# Altium PCB Urukul.PcbDoc (part 13 of 15)
Units mm, origin at the board's own origin, x right, y up, seen from the top; angles counter-clockwise.
Board outline 161.99 x 100 mm, 6 copper layers (L1, L2, L3, L4, P5, L6), stack 1.548 mm thick; 1078 components, 609 nets, 3798 pads, 2552 vias.
Unrouted connection lines stored in the file: 1.
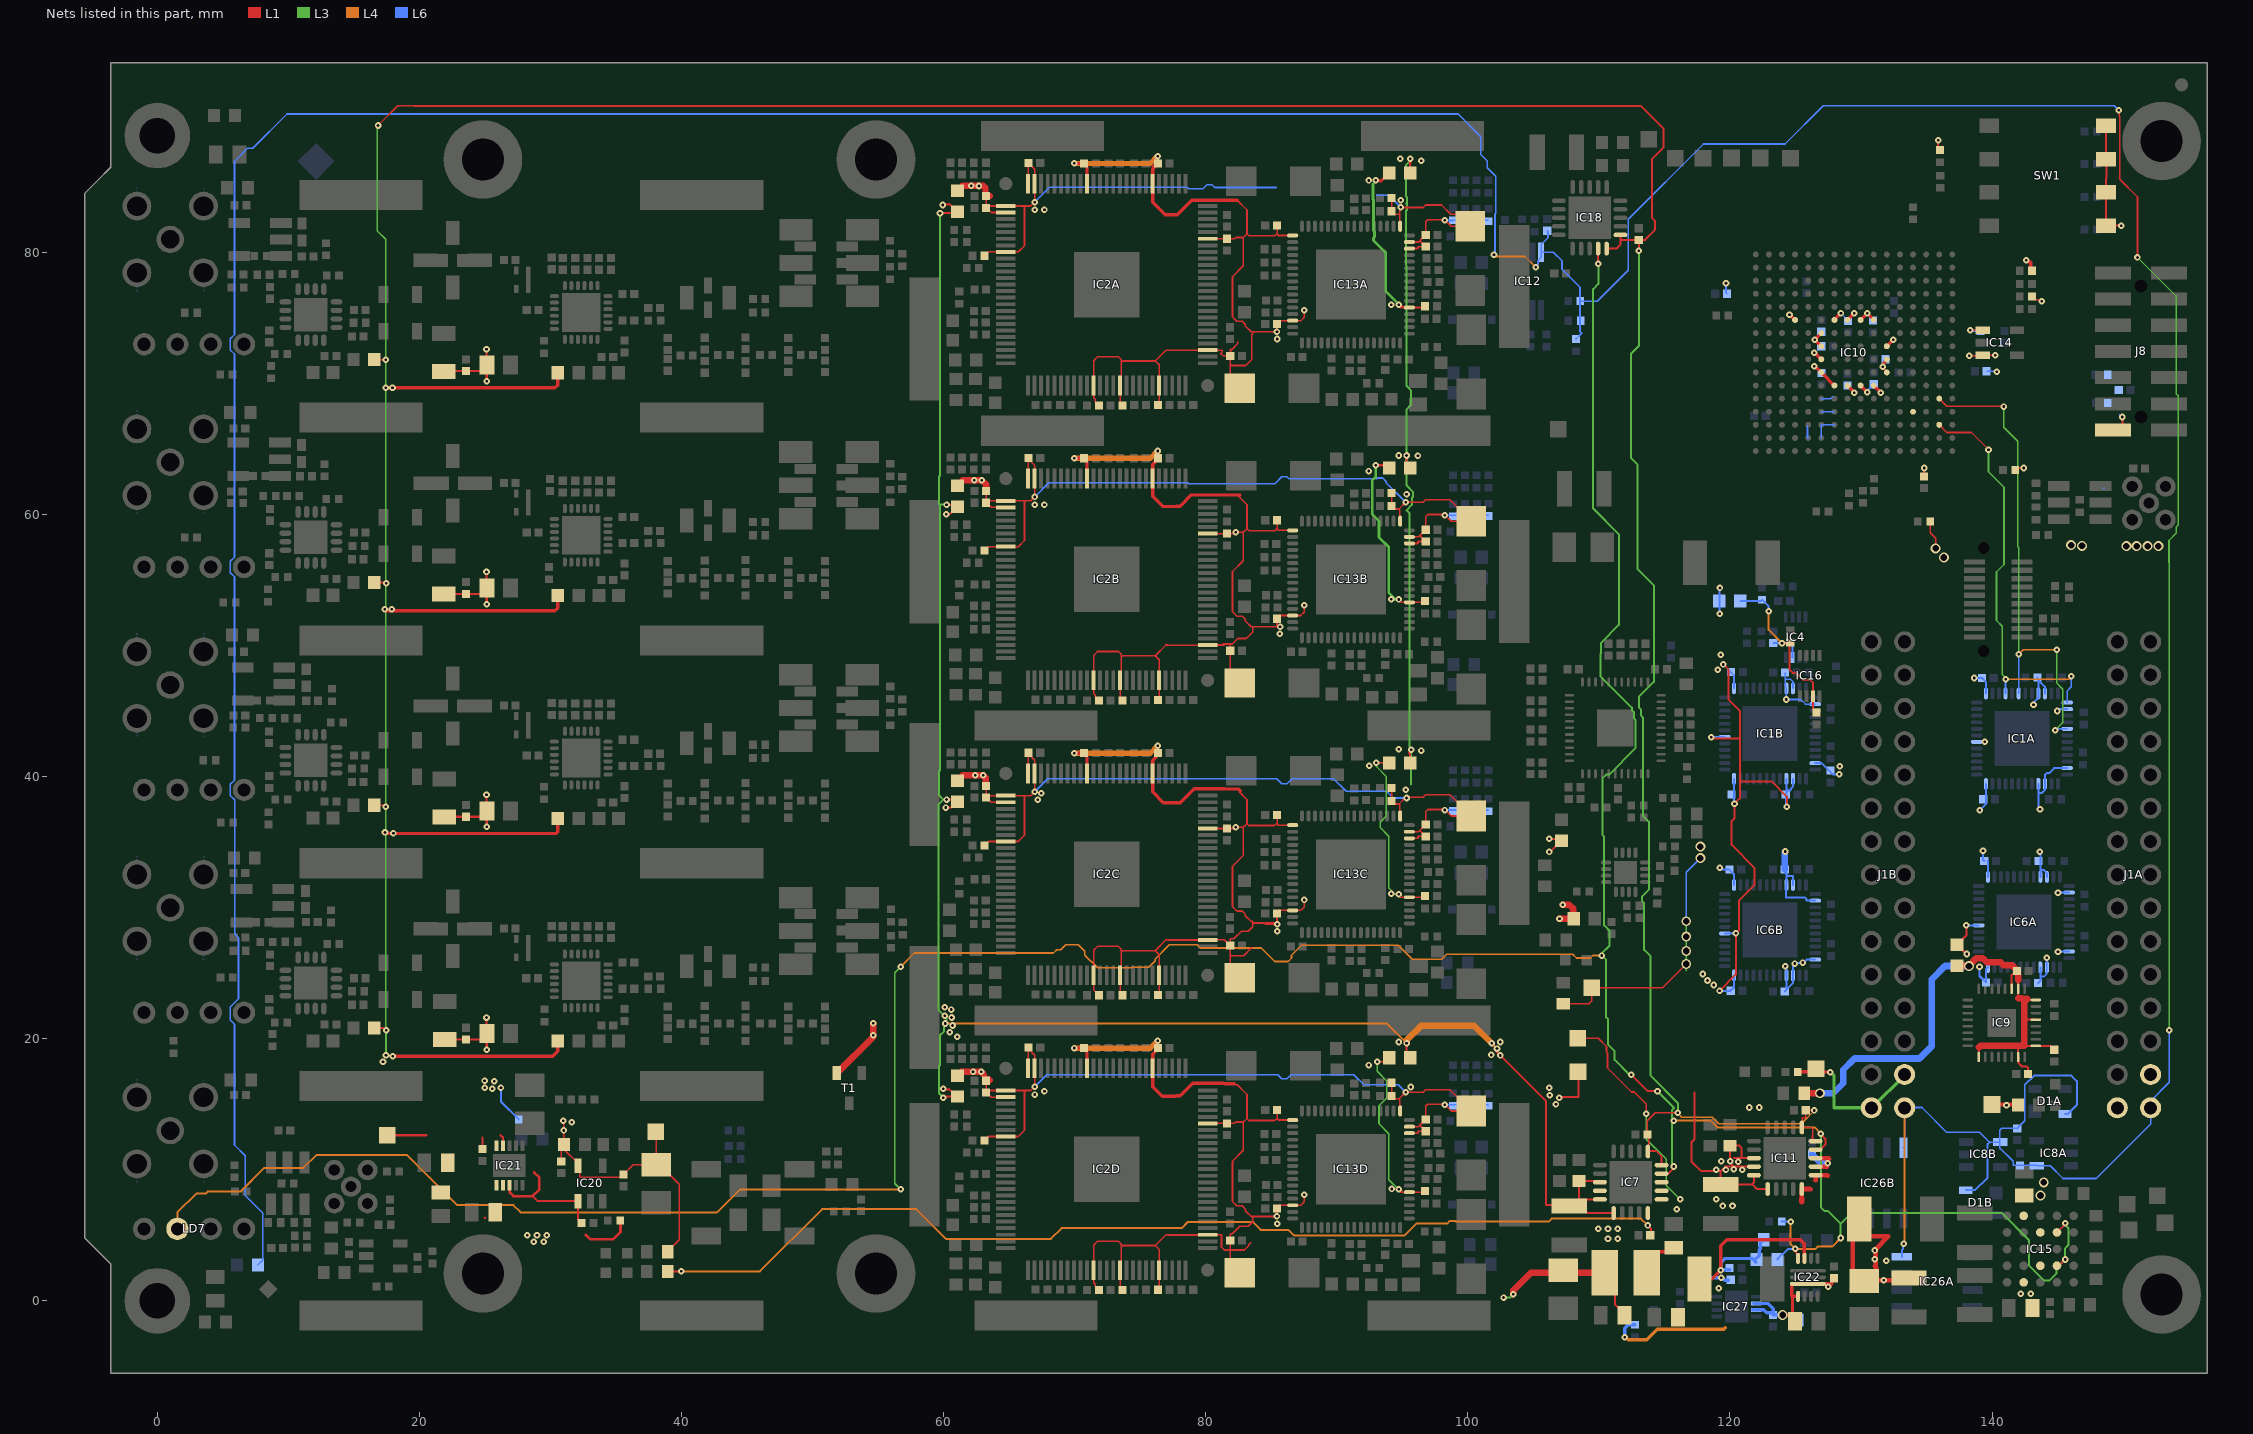
[diagram p15: the nets of this part, all layers, seen from the top]

## Via types
v1: diameter 0.5, hole 0.2, L1 to L6, tented both sides, 1964 vias
v2: diameter 0.5, hole 0.2, L1 to L6, 480 vias
v3: diameter 0.6, hole 0.3, L1 to L6, tented both sides, 52 vias
v4: diameter 0.6, hole 0.3, L1 to L6, 36 vias
v5: diameter 0.762, hole 0.508, L1 to L6, tented both sides, 20 vias

## Nets (pads, with @x,y where several pads share a name; then routed paths per layer and width w, separated by ;. In a path a pad name is that pad's centre, name@x,y a point inside that pad or via, vN(x,y) a via of type N, cw(c..) or ccw(c..) an arc to the next point about the centre after c; other vN are vias at no path point) (continued)
P3V3: C2A.2 C2B.2 C3A.2 C3B.2 C4A.2 C4B.2 C5A.2 C5B.2 C6A.2 C6B.2 C7A.2 C7B.2 C8A.2 C8B.2 C9A.2 C9B.2 C104.2 C166.2 C175.2 C184.2 C185.2 C186.2 C187.2 C188.2 C192.2 C193.2 C197.2 C208.2 C209.2 C210.2 IC1A.2 IC1A.11 IC1A.15 IC1A.16 IC1A.24 IC1A.30 IC1A.37 IC1A.45 IC1A.46 IC1B.2 IC1B.11 IC1B.15 IC1B.16 IC1B.24 IC1B.30 IC1B.37 IC1B.45 IC1B.46 IC6A.2 IC6A.11 IC6A.15 IC6A.16 IC6A.24 IC6A.30 IC6A.37 IC6A.45 IC6A.46 IC6B.2 IC6B.11 IC6B.15 IC6B.16 IC6B.24 IC6B.30 IC6B.37 IC6B.45 IC6B.46 IC10.F4 IC10.F7 IC10.F8 IC10.F9 IC10.F10 IC10.G6 IC10.H6 IC10.H11 IC10.J6 IC10.J11 IC10.K6 IC10.K11 IC10.L7 IC10.L8 IC10.L9 IC10.L10 IC11.1 IC11.18 IC11.19 IC11.20 IC14.1 IC14.3 J8.2 L8.2 L13.2 R1.1 R66.2 R67.2 R115.2 R118.2 R148.2 R171.1 R173.1 R175.1 SW1.1 SW1.2 SW1.3 SW1.4 TP12.1 | length 188.6
  L1 w0.127: R115.2@107.277,22.664 109.236,22.664 109.444,22.872 TP12.1@109.444,23.888 114.854,23.888 v5(116.665,25.699) ; v1(124.545,75.243) v1@124.557,75.243 ; IC10.F4@124.958,74.841 IC10.F4@124.97,74.841 ; v1(126.446,71.324) v1@126.467,71.324 ; v1(126.446,72.341) v1@126.458,72.341 ; v1@126.47,73.338 v1(126.47,73.335) v1@126.473,73.335 ; IC10.K6@126.949,70.841 IC10.K6@126.97,70.841 ; IC10.J6@126.958,71.841 IC10.J6@126.97,71.841 ; IC10.H6@126.967,72.841 IC10.H6@126.97,72.841 ; IC10.G6@126.97,73.838 IC10.G6@126.97,73.841 ; IC10.L8@128.97,69.821 IC10.L8@128.97,69.841 ; IC10.F8@128.97,74.841 IC10.F8@128.97,74.853 ; v1(129.47,69.3) v1@129.47,69.321 ; v1@129.47,75.353 v1(129.47,75.365) ; IC10.L9@129.97,69.83 IC10.L9@129.97,69.841 ; IC10.F9@129.97,74.841 IC10.F9@129.97,74.853 ; v1@130.458,75.341 v1@130.482,75.341 ; v1(130.47,69.319) v1@130.47,69.33 ; IC10.L10@130.97,69.833 IC10.L10@130.97,69.841 ; IC10.F10@130.97,74.841 IC10.F10@130.97,74.853 ; v1(131.495,69.3) v1@131.495,69.308 ; 131.742,71.525 131.742,71.337 v1(131.67,71.265) 131.67,71.203 131.97,70.903 IC10.K11@131.97,70.841 ; IC10.J11@131.97,71.753 IC10.J11@131.97,71.841 ; IC10.H11@131.97,72.841 IC10.H11@131.975,72.841 ; v1@132.469,73.335 v1(132.474,73.335) ; C208.2@134.819,62.908 v1(134.819,63.548) ; R1.1@135.274,59.477 135.274,58.604 135.691,58.187 v5(135.691,57.422) ; v1(138.267,72.112) 139.262,72.112 IC14.3@139.303,72.153 v1(140.253,72.153) ; v1(138.34,74.066) 139.289,74.066 IC14.1@139.303,74.053 ; R175.1@141.771,63.408 141.911,63.548 v1(142.406,63.548) ; R173.1@143.044,76.637 143.044,76.617 143.27,76.391 143.572,76.391 143.691,76.272 v1(143.791,76.272)
  L1 w0.152: 117.294,15.888 117.294,12.314 117.066,12.086 117.066,10.616 117.794,9.888 119.294,9.888 ; v1(118.583,43.007) 118.694,42.896 120.751,42.896 ; v1(119.206,23.653) 120.458,24.904 v1(120.458,28.032) 120.686,28.261 120.686,30.531 121.869,31.713 121.869,33.038 120.121,34.786 120.121,36.601 120.348,36.828 v1(120.348,37.935) 120.751,38.337 120.751,39.638 ; v1(119.483,48.557) 119.894,48.146 119.894,45.863 120.751,45.007 120.751,42.896 ; 120.294,10.888 120.879,10.888 ; IC11.20@121.831,9.58 121.831,9.026 121.693,8.888 ; IC11.19@121.831,10.23 v1@120.319,10.23 ; IC11.18@121.831,10.88 121.823,10.888 120.879,10.888 ; IC11.1@122.881,8.53 122.051,8.53 121.693,8.888 ; v1(124.348,37.685) 124.348,38.464 123.174,39.638 120.751,39.638 ; v1@135.969,88.564 135.893,88.488 135.893,87.942 R148.2@136.02,87.815 ; v1(138.031,28.646) 138.031,27.876 L13.2@137.316,27.16 137.348,27.16 138.046,26.461 v1(138.078,26.461) ; SW1.4@148.694,89.661 SW1.3@148.694,87.121 148.715,87.1 148.715,85.656 148.694,85.635 SW1.1@148.694,82.041 v1(149.87,82.041) ; J8.2@149.844,66.24 149.938,66.334 v1(149.938,67.44) ; 119.294,9.888 119.636,10.23 v1@120.319,10.23 ; 119.294,9.888 C166.2@119.294,8.888 121.693,8.888 ; v1@120.319,10.23 119.994,10.555 R118.2@119.994,11.838 120.717,11.838 120.879,11.676 120.879,10.888 ; 120.751,39.638 120.751,42.896
  L1 w0.254: v1@124.557,75.243 IC10.F4@124.958,74.841 ; v1@126.458,72.341 IC10.J6@126.958,71.841 ; v1@126.467,71.324 IC10.K6@126.949,70.841 ; v1@126.47,73.338 IC10.G6@126.97,73.838 ; v1@126.473,73.335 IC10.H6@126.967,72.841 ; IC10.K6@126.97,70.841 IC10.L7@127.97,69.841 ; IC10.F7@127.97,74.841 v1(128.47,75.341) ; IC10.L8@128.97,69.821 v1@129.47,69.321 ; IC10.F8@128.97,74.853 v1@129.47,75.353 ; IC10.L9@129.97,69.83 v1@130.47,69.33 ; IC10.F9@129.97,74.853 v1@130.458,75.341 ; v1@130.482,75.341 IC10.F10@130.97,74.853 ; IC10.L10@130.97,69.833 v1@131.495,69.308 ; 131.742,71.525 IC10.J11@131.97,71.753 ; IC10.H11@131.975,72.841 v1@132.469,73.335 ; v1(142.619,79.413) 142.686,79.413 142.842,79.256 142.954,79.256 142.954,78.688 R171.1@143.044,78.598
  L3 w0.127: 116.665,25.178 v5(116.665,25.699) v5(116.665,26.69) v5(116.665,27.782) v5(116.665,28.961)
  L6 w0.127: v5(116.665,28.961) 116.665,32.698 v5(117.744,33.777) ; v1(118.583,43.007) 118.608,43.032 IC1B.30@119.608,43.032 ; v1(119.483,48.557) 120.308,47.732 IC1B.37@120.308,46.732 ; v1(119.698,77.653) 119.698,76.922 C209.2@119.781,76.84 ; C4A.2@124.208,47.932 124.208,47.422 ; IC1B.46@124.808,46.732 124.808,47.232 124.618,47.422 124.208,47.422 ; 125.888,66.758 125.888,66.557 125.921,66.523 125.921,65.868 125.97,65.819 ; v1(126.446,71.324) 126.96,70.809 C187.2@126.974,70.809 ; IC1B.2@126.508,45.532 125.758,45.532 125.408,45.882 v1(124.308,45.882) IC1B.45@124.308,46.732 124.208,46.832 124.208,47.422 ; 126.926,68.841 127.673,68.841 127.824,68.992 ; 126.96,67.831 127.948,67.831 127.958,67.841 ; 126.97,65.835 126.968,65.837 126.968,66.838 127.946,66.838 127.97,66.815 ; C104.2@126.97,72.841 126.964,72.841 v1(126.47,73.335) 126.97,73.835 C193.2@126.97,73.941 ; v1(128.47,75.341) C197.2@129.006,74.805 ; C184.2@128.97,69.841 129.47,69.341 v1(129.47,69.3) ; C197.2@129.006,74.777 C197.2@129.006,74.805 ; v1(129.47,75.365) 129.006,74.901 C197.2@129.006,74.805 ; v1(130.47,69.319) 130.47,69.441 C188.2@130.97,69.941 ; v1(131.67,71.265) 131.73,71.265 131.73,71.701 C186.2@131.87,71.841 ; v1(138.34,74.066) 138.403,74.003 C185.2@139.128,74.003 ; C175.2@139.586,70.931 140.318,70.931 v1(140.346,70.904) ; 143.681,24.746 143.981,24.746 144.181,24.946 IC6A.15@144.181,25.446 v1(144.181,26.188) ; 148.473,61.999 148.541,61.999 ; 149.726,67.61 149.897,67.44 v1(149.938,67.44)
  L6 w0.152: v1(119.206,23.653) 119.962,23.653 120.012,23.703 C7B.2@120.058,23.657 120.308,23.907 IC6B.24@120.308,24.832 ; v1(119.208,33.032) 119.333,32.907 C6A.2@119.958,32.907 120.308,32.557 IC6B.37@120.308,31.732 ; v1(119.223,52.424) 119.195,52.452 L8.2@119.195,53.391 119.195,54.351 v1(119.236,54.393) ; IC6B.30@119.608,28.032 v1(120.458,28.032) ; IC1B.24@120.308,39.832 120.308,37.975 v1(120.348,37.935) ; C8B.2@124.183,23.607 C8B.2@124.308,23.732 ; C6B.2@124.183,32.907 124.183,32.66 124.308,32.535 ; v1@124.183,34.257 v1(124.208,34.282) ; v1(124.208,25.532) 124.208,25.582 124.308,25.682 IC6B.16@124.308,24.832 C8B.2@124.308,23.732 ; C6B.2@124.308,32.682 124.308,32.535 ; IC1B.16@124.308,39.832 124.308,39.092 ; v1(124.348,37.685) 124.258,37.775 C2A.2@124.258,38.632 124.308,38.682 124.308,39.092 ; IC6B.46@124.808,31.732 124.808,32.035 124.819,32.046 124.819,32.41 124.433,32.41 124.308,32.535 ; IC1B.15@124.808,39.832 124.808,39.224 124.62,39.036 124.62,38.957 124.443,38.957 124.308,39.092 ; IC6B.11@126.508,26.032 125.845,26.032 125.595,25.782 124.958,25.782 124.808,25.632 IC6B.15@124.808,24.832 124.808,24.232 C8B.2@124.308,23.732 ; IC6B.2@126.508,30.532 125.845,30.532 125.845,30.644 125.708,30.782 124.283,30.782 124.26,30.805 124.26,31.684 IC6B.45@124.308,31.732 124.308,32.535 ; IC1B.11@126.508,41.032 127,41.032 127.855,40.177 v1(128.349,40.177) ; v1(138.031,28.646) IC6A.30@138.981,28.646 ; v1(138.631,47.521) C4B.2@139.231,47.521 139.531,47.221 IC1A.37@139.531,46.346 ; v1(139.043,25.496) 139.043,24.784 C2B.2@139.531,24.296 139.531,25.296 IC6A.24@139.681,25.446 ; v1(139.056,37.421) 139.531,37.896 IC1A.24@139.531,39.446 ; v1(139.306,34.346) 139.306,33.646 C3B.2@139.406,33.546 ; C3B.2@139.656,33.546 139.681,33.521 IC6A.37@139.681,32.346 ; v1(143.162,45.494) 143.188,45.52 143.188,45.668 143.531,46.011 IC1A.45@143.531,46.346 C3A.2@143.531,47.371 ; C3A.2@143.456,47.571 143.456,47.446 C3A.2@143.531,47.371 ; C7A.2@143.506,24.246 143.681,24.421 143.681,24.746 IC6A.16@143.681,25.446 ; IC1A.16@143.531,39.446 143.531,38.746 ; v1(143.631,34.271) 143.681,34.221 143.681,32.871 ; v1(143.656,37.521) 143.531,37.646 143.531,38.746 ; IC6A.45@143.681,32.346 143.681,32.871 ; IC1A.46@144.031,46.346 144.031,46.871 C3A.2@143.531,47.371 ; IC6A.46@144.181,32.346 144.181,32.621 143.931,32.871 143.681,32.871 ; v1(144.96,45.006) 144.93,45.006 145.069,45.146 IC1A.2@145.731,45.146 ; v1(145.031,26.646) IC6A.11@145.881,26.646 ; v1(145.031,31.146) IC6A.2@145.881,31.146 ; IC1A.11@145.731,40.646 144.731,40.646 144.356,40.271 144.181,40.271 144.031,40.121 IC1A.15@144.031,39.446 144.031,38.971 143.806,38.746 143.531,38.746
  L6 w0.483: C6B.2@124.183,32.907 v1@124.183,34.257
  other v1: 118.944,9.988 119.694,9.988 120.944,9.988 120.294,10.033 120.625,10.617 119.329,10.643 120.015,10.643 121.473,14.749 122.223,14.749 118.756,24.097 118.286,24.442 117.915,24.936 124.944,25.735 125.554,25.811 128.375,40.787 139.442,42.671 119.067,48.138 119.307,49.303 130.47,75.365 135.893,88.564
  other v5: 117.744,34.653 136.318,56.717 150.241,57.578 151.035,57.578 151.871,57.578 152.691,57.578 146.867,57.608 146.03,57.657
P3V3_CLK1: C86.2 C89.2 C90.2 IC9.1 IC9.7 IC9.9 IC9.13 IC9.16 IC9.18 IC9.19 L13.1 R150.2 | length 44.2
  L1 w0.152: L13.1@137.316,25.56 L13.1@137.343,25.56 ; IC9.1@138.991,18.605 138.991,19.33 ; IC9.19@141.491,23.805 141.491,24.856 141.566,24.931 141.66,24.931 C86.2@141.894,25.165 ; C86.2@141.794,25.165 141.794,25.265 C86.2@141.821,25.291 ; 141.991,19.427 IC9.7@141.991,18.605 142.031,18.565 142.031,18.13 142.285,17.876 142.65,17.876 142.724,17.802 142.744,17.802 C89.2@142.744,17.292 ; 141.991,23.086 IC9.18@141.991,23.805 141.991,24.48 ; 142.041,19.477 142.063,19.455 ; 142.444,19.455 IC9.9@143.341,19.455 144.441,19.455 C90.2@144.741,19.155 ; 142.544,21.455 IC9.13@143.341,21.455 ; 142.689,23.028 142.762,22.955 IC9.16@143.341,22.955
  L1 w0.5: R150.2@125.67,15.837 v5(126.861,15.837) ; L13.1@137.343,25.56 v5@138.22,25.56 ; v5@138.252,25.592 138.783,26.123 139.303,26.123 139.599,25.826 140.657,25.826 140.891,25.592 141.519,25.592 C86.2@141.821,25.291 ; 138.991,19.33 139.138,19.477 142.041,19.477 141.991,19.427 ; C86.2@141.92,24.963 141.991,24.892 141.991,24.48 ; 141.991,23.086 142.235,23.086 142.293,23.028 142.689,23.028 142.472,22.811 142.472,19.482 142.444,19.455 142.063,19.455
  L6 w0.5: v5(126.861,15.837) 127.888,15.837 128.644,16.593 128.644,17.623 129.509,18.488 134.46,18.488 135.407,19.435 135.407,24.536 136.418,25.547 v5@138.298,25.547
  other v5: 138.235,25.532
P3V3_CLK2: C13.2 C45.2 C46.2 IC4.7 IC16.7 L8.1 R36.2 | length 15.4
  L1 w0.152: v1(123.97,50.182) C45.2@124.545,50.182 ; C45.2@124.598,50.235 C45.2@124.545,50.182 ; C46.2@126.598,44.885 126.348,45.135 IC16.7@126.348,46.135 126.348,47.147 126.113,47.382 125.533,47.382 125.008,47.907 124.783,47.907 124.545,48.145 C45.2@124.545,50.182
  L4 w0.152: v1(122.958,52.607) 122.958,51.194 v1(123.97,50.182)
  L6 w0.152: L8.1@120.795,53.391 122.362,53.391 R36.2@122.458,53.487 122.958,52.987 v1(122.958,52.607) ; C13.2@123.308,50.182 v1(123.97,50.182) 124.633,50.182 124.758,50.057 IC4.7@124.758,49.082
P3V3_DACA: C124A.2 C125A.2 C126A.2 C129A.2 C130A.2 C157A.2 C158A.2 C159A.2 C162A.1 IC2A.74 IC2A.75 IC2A.76 IC2A.77 IC2A.83 IC13A.46 IC13A.47 IC13A.49 L15A.1 R96A.2 R97A.2 R98A.2 R99A.2 | length 65.5
  L1 w0.127: L15A.1@61.044,84.688 61.446,85.09 61.469,85.113 62.094,85.113 62.694,85.113 62.919,85.113 62.942,85.09 63.195,84.837 63.231,84.801 63.244,84.801 63.244,84.303 C158A.2@63.244,84.291 C157A.2@63.244,83.391 ; C124A.2@63.114,79.738 63.417,80.041 IC2A.83@64.744,80.041 65.694,80.041 66.169,80.516 66.169,83.466 66.244,83.541 ; IC2A.77@64.744,83.041 63.641,83.041 63.291,83.391 C157A.2@63.244,83.391 ; IC2A.75@66.444,85.241 66.444,86.791 C159A.2@66.469,86.816 66.473,86.816 66.944,86.345 IC2A.74@66.944,85.241 v1(66.944,83.838) 66.647,83.541 66.244,83.541 ; C126A.2@94.184,84.141 C129A.2@94.184,83.138 94.409,82.913 94.744,82.913 ; v1@94.801,83.317 94.801,82.97 94.744,82.913 ; IC13A.49@94.834,81.991 94.794,82.031 94.794,82.863 94.744,82.913 ; v1@94.91,83.425 96.585,83.425 96.773,83.613 97.993,83.613 98.695,82.911 99.341,82.911 100.228,82.024 100.264,81.988 100.194,81.988 98.727,81.988 98.257,82.458 98.221,82.494 96.936,82.494 96.784,82.341 C125A.2@96.784,81.338 96.334,80.888 ; IC13A.46@95.534,80.291 96.171,80.291 96.194,80.313 96.194,80.438 C130A.2@96.784,80.438 96.334,80.888 ; IC13A.47@95.534,80.791 96.234,80.791 96.333,80.89 96.334,80.888 ; C157A.2@63.244,83.391 63.394,83.541 IC2A.76@64.744,83.541 66.244,83.541
  L1 w0.483: L15A.1@61.446,85.09 v1(62.094,85.09) 62.694,85.09 62.942,85.09 63.017,85.09 63.195,84.912 63.195,84.837 63.195,84.303 63.244,84.303 C158A.2@63.525,84.303
  L6 w0.127: v1(66.944,83.838) 68.083,84.977 78.572,84.977 78.701,84.848 79.796,84.848 80.096,85.148 80.482,85.148 80.681,84.949 85.388,84.949 ; 93.043,84.381 93.093,84.381 93.126,84.348 93.987,84.348 v1(94.882,83.453) ; v1(98.251,82.438) 98.859,82.438 R97A.2@98.869,82.448 99.771,82.448 100.66,82.448 R98A.2@101.569,82.448
  other v1: 66.944,83.238 67.694,83.238 94.877,83.988 62.694,85.063
P3V3_DACB: C124B.2 C125B.2 C126B.2 C129B.2 C130B.2 C157B.2 C158B.2 C159B.2 C162B.1 IC2B.74 IC2B.75 IC2B.76 IC2B.77 IC2B.83 IC13B.46 IC13B.47 IC13B.49 L15B.1 R96B.2 R97B.2 R98B.2 R99B.2 | length 71.6
  L1 w0.127: C124B.2@63.114,57.238 63.417,57.541 IC2B.83@64.744,57.541 65.694,57.541 66.169,58.016 66.169,60.966 66.244,61.041 ; C158B.2@63.231,61.728 63.231,61.791 C158B.2@63.231,62.044 ; C158B.2@63.244,61.791 C157B.2@63.244,60.891 ; IC2B.77@64.744,60.541 63.641,60.541 63.291,60.891 C157B.2@63.244,60.891 ; IC2B.75@66.444,62.741 66.444,64.291 C159B.2@66.469,64.316 66.469,64.213 66.944,63.738 IC2B.74@66.944,62.741 v1(66.944,61.338) 66.647,61.041 66.244,61.041 ; C126B.2@94.184,61.641 C129B.2@94.184,60.638 94.409,60.413 94.744,60.413 ; IC13B.49@94.834,59.491 94.794,59.531 94.794,60.363 94.744,60.413 ; IC13B.46@95.534,57.791 96.171,57.791 96.194,57.813 96.194,57.938 C130B.2@96.784,57.938 96.334,58.388 ; IC13B.47@95.534,58.291 96.234,58.291 96.333,58.39 96.334,58.388 ; C157B.2@63.244,60.891 63.394,61.041 IC2B.76@64.744,61.041 66.244,61.041 ; 94.744,60.413 v1(95.256,60.925) 96.585,60.925 96.773,61.113 98.639,61.113 C162B.1@100.264,59.488 98.727,59.488 98.257,59.958 98.221,59.994 96.936,59.994 96.784,59.841 C125B.2@96.784,58.838 96.334,58.388
  L1 w0.483: L15B.1@61.044,62.188 61.469,62.613 v1(62.344,62.613) v1(62.919,62.613) 63.231,62.301 63.244,62.301 C158B.2@63.244,61.791
  L6 w0.127: v1(66.944,61.338) 68.028,62.422 78.627,62.422 78.701,62.348 85.287,62.348 85.811,62.872 86.197,62.872 86.351,62.718 93.066,62.718 93.126,62.779 93.512,62.779 93.785,62.506 93.785,62.397 v1(95.256,60.925) ; v1(98.247,59.948) 98.857,59.948 99.771,59.948 100.686,59.948 R98B.2@101.569,59.948
  other v1: 66.944,60.738 67.694,60.738 95.322,61.535
P3V3_DACC: C124C.2 C125C.2 C126C.2 C129C.2 C130C.2 C157C.2 C158C.2 C159C.2 C162C.1 IC2C.74 IC2C.75 IC2C.76 IC2C.77 IC2C.83 IC13C.46 IC13C.47 IC13C.49 L15C.1 R96C.2 R97C.2 R98C.2 R99C.2 | length 70.9
  L1 w0.127: C124C.2@63.114,34.738 63.417,35.041 IC2C.83@64.744,35.041 65.694,35.041 66.169,35.516 66.169,38.466 66.244,38.541 ; C158C.2@63.244,39.291 C157C.2@63.244,38.391 ; IC2C.77@64.744,38.041 63.641,38.041 63.291,38.391 C157C.2@63.244,38.391 ; IC2C.75@66.444,40.241 66.444,41.791 C159C.2@66.469,41.816 66.469,41.713 66.944,41.238 IC2C.74@66.944,40.241 v1(66.944,38.838) 66.647,38.541 66.244,38.541 ; C126C.2@94.184,39.141 C129C.2@94.184,38.138 94.409,37.913 94.744,37.913 ; IC13C.49@94.834,36.991 94.794,37.031 94.794,37.863 94.744,37.913 ; v1@95.256,38.425 94.744,37.913 ; v1@95.322,38.425 96.585,38.425 96.773,38.613 98.639,38.613 C162C.1@100.264,36.988 98.727,36.988 98.257,37.458 98.221,37.494 96.936,37.494 96.784,37.341 C125C.2@96.784,36.338 96.334,35.888 ; IC13C.46@95.534,35.291 96.171,35.291 96.194,35.313 96.194,35.438 C130C.2@96.784,35.438 96.334,35.888 ; IC13C.47@95.534,35.791 96.234,35.791 96.333,35.89 96.334,35.888 ; C157C.2@63.244,38.391 63.394,38.541 IC2C.76@64.744,38.541 66.244,38.541
  L1 w0.483: L15C.1@61.044,39.688 61.462,40.107 62.419,40.107 v1(63.017,40.107) 63.221,39.903 C158C.2@63.221,39.446
  L6 w0.127: v1(66.944,38.838) 67.947,39.841 85.411,39.841 85.811,39.441 86.197,39.441 86.597,39.841 89.751,39.841 90.718,38.874 93.791,38.874 94.298,38.368 v1(95.322,38.368) ; v1(98.247,37.448) 98.857,37.448 99.771,37.448 100.686,37.448 R98C.2@101.569,37.448
  other v1: 67.194,38.238 67.444,38.738 95.266,38.988 62.419,40.113
P3V3_DACD: C124D.2 C125D.2 C126D.2 C129D.2 C130D.2 C157D.2 C158D.2 C159D.2 C162D.1 IC2D.74 IC2D.75 IC2D.76 IC2D.77 IC2D.83 IC13D.46 IC13D.47 IC13D.49 L15D.1 R96D.2 R97D.2 R98D.2 R99D.2 | length 73
  L1 w0.127: L15D.1@61.044,17.188 61.334,17.478 61.469,17.613 62.244,17.613 62.862,17.613 62.919,17.613 62.958,17.574 63.231,17.301 63.244,17.301 63.244,16.891 C158D.2@63.244,16.791 C157D.2@63.244,15.891 ; C124D.2@63.114,12.238 63.417,12.541 IC2D.83@64.744,12.541 65.694,12.541 66.169,13.016 66.169,15.966 66.244,16.041 ; IC2D.77@64.744,15.541 63.641,15.541 63.291,15.891 C157D.2@63.244,15.891 ; IC2D.75@66.444,17.741 66.444,19.291 C159D.2@66.469,19.316 66.469,19.213 66.944,18.738 IC2D.74@66.944,17.741 v1(66.944,16.338) 66.647,16.041 66.244,16.041 ; C126D.2@94.184,16.641 C129D.2@94.184,15.638 94.409,15.413 94.744,15.413 ; IC13D.49@94.834,14.491 94.794,14.531 94.794,15.363 94.744,15.413 ; IC13D.46@95.534,12.791 96.171,12.791 96.194,12.813 96.194,12.938 C130D.2@96.784,12.938 96.334,13.388 ; IC13D.47@95.534,13.291 96.237,13.291 96.334,13.388 ; C157D.2@63.244,15.891 63.394,16.041 IC2D.76@64.744,16.041 66.244,16.041 ; 94.744,15.413 v1(95.256,15.925) 96.585,15.925 96.773,16.113 98.639,16.113 C162D.1@100.264,14.488 98.727,14.488 98.257,14.958 98.221,14.994 96.936,14.994 96.784,14.841 C125D.2@96.784,13.838 96.334,13.388
  L1 w0.5: L15D.1@61.334,17.478 62.244,17.478 v1(62.862,17.478) 63.039,17.301 ; C158D.2@63.195,16.891 63.244,16.891 63.449,16.891 C158D.2@63.525,16.815
  L6 w0.127: v1(66.944,16.338) 67.866,17.261 85.492,17.261 85.811,16.941 86.197,16.941 86.516,17.261 91.301,17.261 92.073,16.488 94.693,16.488 v1(95.256,15.925) ; v1(98.247,14.948) 98.857,14.948 99.771,14.948 100.66,14.948 R98D.2@101.569,14.948
  other v1: 66.944,15.738 67.694,15.988 95.644,16.313 62.244,17.488
P3V3_DRVA: C85A.2 C105A.2 C106A.2 C108A.2 C109A.2 C110A.2 C111A.2 C114A.1 C137A.2 C141A.2 C142A.2 IC2A.11 IC2A.15 IC2A.21 IC2A.28 IC2A.45 IC2A.56 IC2A.66 IC13A.1 IC13A.14 IC13A.37 L18A.1 | length 89.5
  L1 w0.127: v1(69.977,86.786) v1(69.977,86.786) C108A.2@70.719,86.788 ; C109A.2@71.844,68.316 71.569,68.591 71.569,68.791 71.444,68.916 IC2A.11@71.444,69.841 71.444,71.739 71.746,72.041 73.341,72.041 73.555,71.827 73.555,71.588 ; C110A.2@73.644,68.316 73.469,68.491 73.469,69.816 IC2A.15@73.444,69.841 73.555,69.952 73.555,71.588 ; v1(76.327,87.345) 76.344,87.328 C106A.2@76.344,86.788 ; C111A.2@76.344,68.341 76.444,68.441 IC2A.21@76.444,69.841 76.444,71.413 76.141,71.716 ; IC2A.45@80.144,81.041 C105A.2@81.619,81.041 82.197,81.041 82.294,81.138 82.869,81.138 ; C85A.2@81.893,72.156 81.893,72.615 82.022,72.615 82.452,73.045 82.452,73.172 ; 82.394,83.988 83.144,83.238 83.144,81.413 ; C114A.1@82.589,69.641 81.871,70.359 81.871,71.467 ; 83.518,73.756 83.518,71.826 83.061,71.369 81.969,71.369 81.871,71.467 ; 83.594,73.756 83.594,73.938 ; C137A.2@85.444,82.063 85.444,81.438 ; IC13A.1@86.634,81.291 85.541,81.291 85.444,81.388 85.444,81.438 ; v1(87.528,75.585) 87.528,75.052 87.271,74.795 87.271,74.791 IC13A.14@86.634,74.791 85.531,74.791 85.438,74.697 C142A.2@85.438,74.544 85.438,73.942 v1(85.434,73.938) 83.594,73.938 ; 94.897,75.791 IC13A.37@95.534,75.791 96.687,75.791 96.764,75.868 C141A.2@96.784,75.888 ; 73.555,71.588 73.684,71.716 76.141,71.716 ; 76.141,71.716 76.965,72.541 77.109,72.541 77.124,72.525 80.128,72.525 IC2A.28@80.144,72.541 81.255,72.541 81.255,72.392 81.139,72.277 81.311,72.105 C85A.2@81.871,72.105 81.871,71.467 ; 82.869,81.138 82.869,78.978 82.042,78.15 82.042,75.08 82.375,74.747 82.785,74.747 83.024,74.508 83.024,74.376 83.462,73.938 83.594,73.938 ; 82.869,81.138 83.144,81.413 ; 83.144,81.413 83.294,81.263 85.269,81.263 85.444,81.438
  L1 w0.203: v1(92.973,85.499) 93.242,85.499 93.308,85.433 93.376,85.433 L18A.1@93.992,86.05 ; v1(94.742,76.017) 94.824,76.017 95.021,75.819 95.352,75.819 IC13A.37@95.377,75.794
  L1 w0.254: v1(69.977,86.786) 70.717,86.786 C108A.2@70.719,86.788 70.944,86.563 IC2A.66@70.944,85.241 ; C106A.2@76.104,86.518 76.089,86.533 76.034,86.589 75.997,86.589 75.983,86.575 75.983,86.373 75.95,86.34 75.956,86.334 75.956,85.253 IC2A.56@75.944,85.241 75.944,83.832 76.908,82.869 77.82,82.869 78.733,83.782 78.733,83.8 78.922,83.988 82.394,83.988
  L3 w0.203: v1@92.964,85.42 92.757,85.213 92.757,84.064 92.798,84.023 92.798,81.675 92.883,81.589 92.883,81.172 92.798,81.087 92.798,80.924 93.723,79.999 93.723,77.036 v1(94.742,76.017)
  L4 w0.406: v1(69.977,86.786) 69.98,86.783 75.764,86.783 v1(76.327,87.345)
  other v1: 85.444,73.388 94.158,75.997 92.444,85.488
P3V3_DRVB: C85B.2 C105B.2 C106B.2 C108B.2 C109B.2 C110B.2 C111B.2 C114B.1 C137B.2 C141B.2 C142B.2 IC2B.11 IC2B.15 IC2B.21 IC2B.28 IC2B.45 IC2B.56 IC2B.66 IC13B.1 IC13B.14 IC13B.37 L18B.1 | length 86.2
  L1 w0.127: v1(69.977,64.286) 69.978,64.288 v1@70.104,64.288 ; C109B.2@71.844,45.816 71.569,46.091 71.569,46.211 71.444,46.336 IC2B.11@71.444,47.341 71.444,49.239 71.746,49.541 73.341,49.541 73.555,49.327 73.555,49.088 ; C110B.2@73.644,45.816 73.469,45.991 73.469,47.316 IC2B.15@73.444,47.341 73.555,47.452 73.555,49.088 ; v1(76.327,64.845) 76.344,64.828 C106B.2@76.344,64.288 ; C111B.2@76.344,45.841 76.444,45.941 IC2B.21@76.444,47.341 76.444,48.913 76.141,49.216 ; IC2B.45@80.144,58.541 C105B.2@81.619,58.541 82.197,58.541 v1(82.294,58.638) 82.869,58.638 ; 82.507,61.375 83.144,60.738 83.144,58.913 ; C114B.1@82.589,47.141 81.871,47.859 C85B.2@81.871,49.605 81.871,50.115 ; C137B.2@85.444,59.563 85.444,58.938 ; v1(85.669,51.438) v1@85.434,51.438 ; IC13B.1@86.634,58.791 85.541,58.791 85.444,58.888 85.444,58.938 ; v1(87.528,53.085) 87.528,52.552 87.271,52.295 87.271,52.291 IC13B.14@86.634,52.291 85.531,52.291 85.438,52.197 C142B.2@85.438,52.044 85.438,51.442 v1@85.434,51.438 ; 94.897,53.291 IC13B.37@95.534,53.291 96.687,53.291 96.764,53.368 C141B.2@96.784,53.388 ; 73.555,49.088 73.684,49.216 76.141,49.216 ; 76.141,49.216 76.965,50.041 77.109,50.041 77.124,50.025 80.128,50.025 IC2B.28@80.144,50.041 81.404,50.041 81.329,50.115 81.871,50.115 ; 81.871,50.115 82.018,50.115 82.434,50.531 83.094,50.531 83.594,51.031 83.594,51.438 ; 82.869,58.638 83.144,58.913 ; 82.869,58.638 82.869,56.478 82.042,55.65 82.042,52.58 82.375,52.247 82.785,52.247 83.024,52.008 83.024,51.876 83.462,51.438 83.594,51.438 ; 83.144,58.913 83.294,58.763 85.269,58.763 85.444,58.938 ; 83.594,51.438 v1@85.434,51.438
  L1 w0.203: v1(92.972,63.749) 93.691,63.749 93.941,63.499 L18B.1@93.992,63.55
  L1 w0.254: v1@70.104,64.288 C108B.2@70.719,64.288 70.944,64.063 IC2B.66@70.944,62.741 ; C106B.2@76.344,64.288 76.144,64.088 76.144,64.028 75.944,63.828 IC2B.56@75.944,62.741 75.944,61.377 76.712,60.609 77.703,60.609 77.729,60.635 78.041,60.635 78.894,61.488 82.581,61.488 82.601,61.468
  L3 w0.203: 92.973,63.499 92.973,62.854 92.695,62.576 92.695,60.027 93.223,59.499 93.223,58.249 93.973,57.499 93.973,54.017 94.315,53.675 94.473,53.517 v1(94.742,53.517)
  L4 w0.406: v1(69.977,64.286) 69.98,64.283 75.764,64.283 v1(76.327,64.845)
  other v1: 85.649,50.902 94.158,53.518 92.444,63.313
P3V3_DRVC: C85C.2 C105C.2 C106C.2 C108C.2 C109C.2 C110C.2 C111C.2 C114C.1 C137C.2 C141C.2 C142C.2 IC2C.11 IC2C.15 IC2C.21 IC2C.28 IC2C.45 IC2C.56 IC2C.66 IC13C.1 IC13C.14 IC13C.37 L18C.1 | length 89.8
  L1 w0.127: v1(69.977,41.786) 69.978,41.788 C108C.2@70.719,41.788 ; C109C.2@71.844,23.316 71.45,23.71 71.45,24.109 71.444,24.115 IC2C.11@71.444,24.841 71.444,26.739 71.746,27.041 73.341,27.041 73.555,26.827 73.555,26.588 ; C110C.2@73.644,23.316 73.469,23.491 73.469,24.816 IC2C.15@73.444,24.841 73.555,24.952 73.555,26.588 ; v1(76.327,42.345) 76.344,42.328 C106C.2@76.344,41.788 ; C111C.2@76.344,23.341 76.444,23.441 IC2C.21@76.444,24.841 76.444,26.413 76.141,26.716 ; IC2C.45@80.144,36.041 C105C.2@81.619,36.041 82.197,36.041 v1(82.294,36.138) 82.869,36.138 ; 82.548,38.834 83.144,38.238 83.144,36.413 ; C114C.1@82.589,24.641 81.871,25.359 81.871,26.407 ; 83.493,26.944 83.493,26.938 82.89,26.334 81.944,26.334 81.871,26.407 ; 83.594,28.938 83.462,28.938 83.024,29.376 83.024,29.508 82.785,29.747 82.375,29.747 82.042,30.08 82.042,33.15 82.869,33.978 82.869,36.138 ; v1(85.444,28.738) 84.571,28.738 84.48,28.829 ; C137C.2@85.444,37.063 85.444,36.438 ; IC13C.1@86.634,36.291 85.541,36.291 85.444,36.388 85.444,36.438 ; v1(87.528,30.585) 87.528,30.052 87.271,29.795 87.271,29.791 IC13C.14@86.634,29.791 85.531,29.791 85.438,29.697 C142C.2@85.438,29.544 85.438,28.942 85.339,28.843 85.325,28.829 84.48,28.829 ; v1(93.024,41.05) L18C.1@93.992,41.05 ; 94.897,30.791 IC13C.37@95.534,30.791 96.687,30.791 96.764,30.868 C141C.2@96.784,30.888 ; 73.555,26.588 73.684,26.716 76.141,26.716 ; 76.141,26.716 76.965,27.541 77.109,27.541 77.124,27.525 80.128,27.525 IC2C.28@80.144,27.541 81.404,27.541 81.42,27.557 C85C.2@81.871,27.105 ; 81.871,26.407 C85C.2@81.871,27.105 ; C85C.2@81.871,27.105 81.871,27.615 82.149,27.615 82.725,28.191 83.254,28.191 83.594,28.531 83.594,28.829 84.48,28.829 ; 82.869,36.138 83.144,36.413 ; 83.144,36.413 83.294,36.263 85.269,36.263 85.444,36.438
  L1 w0.254: v1(69.977,41.786) 70.717,41.786 C108C.2@70.719,41.788 70.944,41.563 IC2C.66@70.944,40.241 ; C106C.2@76.344,41.788 76.344,41.631 75.944,41.231 IC2C.56@75.944,40.241 75.944,38.827 76.773,37.998 78.054,37.998 79.121,39.065 81.428,39.065 81.434,39.059 82.48,39.059 82.626,38.913
  L3 w0.127: v1(93.024,41.05) 93.024,40.767 93.785,40.006 93.785,36.987 93.303,36.506 93.303,36.12 93.973,35.451 93.973,31.499 94.289,31.183 94.455,31.017 v1(94.742,31.017)
  L4 w0.406: v1(69.977,41.786) 69.98,41.783 75.764,41.783 v1(76.327,42.345)
  other v1: 85.444,28.188 94.169,31.063 92.464,40.833
P3V3_DRVD: C85D.2 C105D.2 C106D.2 C108D.2 C109D.2 C110D.2 C111D.2 C114D.1 C137D.2 C141D.2 C142D.2 IC2D.11 IC2D.15 IC2D.21 IC2D.28 IC2D.45 IC2D.56 IC2D.66 IC13D.1 IC13D.14 IC13D.37 L18D.1 | length 88.7
  L1 w0.127: v1(69.977,19.286) v1(69.977,19.286) ; C109D.2@71.844,0.816 71.569,1.091 71.569,1.253 71.444,1.378 IC2D.11@71.444,2.341 71.444,4.239 71.746,4.541 73.341,4.541 73.555,4.327 73.555,4.088 ; C110D.2@73.644,0.816 73.469,0.991 73.469,2.316 IC2D.15@73.444,2.341 73.555,2.452 73.555,4.088 ; v1(76.327,19.845) 76.344,19.828 C106D.2@76.344,19.288 C106D.2@76.344,19.219 ; C111D.2@76.344,0.841 76.444,0.941 IC2D.21@76.444,2.341 76.444,3.913 76.141,4.216 ; IC2D.45@80.144,13.541 C105D.2@81.619,13.541 82.197,13.541 82.294,13.638 82.869,13.638 ; 82.196,16.488 82.394,16.488 83.144,15.738 83.144,13.913 ; C114D.1@82.589,2.141 81.871,2.859 81.871,3.881 ; 83.417,4.414 83.271,4.269 83.271,4.216 82.936,3.881 81.871,3.881 ; C137D.2@85.444,14.563 85.444,13.938 ; IC13D.1@86.634,13.791 85.541,13.791 85.444,13.888 85.444,13.938 ; v1(87.528,8.085) 87.528,7.552 87.271,7.295 87.271,7.291 IC13D.14@86.634,7.291 85.531,7.291 85.438,7.197 C142D.2@85.438,7.044 85.438,6.442 v1(85.434,6.438) 83.594,6.438 ; v1(93.078,18.249) 93.691,18.249 L18D.1@93.992,18.55 ; v1@94.869,8.458 94.962,8.365 94.962,8.357 94.932,8.326 94.897,8.291 IC13D.37@95.534,8.291 96.687,8.291 96.764,8.368 C141D.2@96.784,8.388 ; 73.555,4.088 73.684,4.216 76.141,4.216 ; 76.141,4.216 76.965,5.041 77.109,5.041 77.124,5.025 80.128,5.025 IC2D.28@80.144,5.041 81.207,5.041 81.207,4.084 81.41,3.881 81.871,3.881 ; 81.871,3.881 C85D.2@81.871,4.605 81.871,5.115 82.018,5.115 82.589,5.686 83.25,5.686 83.594,6.031 83.594,6.438 ; 82.869,13.638 82.869,11.478 82.042,10.65 82.042,7.58 82.375,7.247 82.785,7.247 83.024,7.008 83.024,6.876 83.462,6.438 83.594,6.438 ; 82.869,13.638 83.144,13.913 ; 83.144,13.913 83.294,13.763 85.269,13.763 85.444,13.938
  L1 w0.254: v1(69.977,19.286) 70.717,19.286 C108D.2@70.719,19.288 70.944,19.063 IC2D.66@70.944,17.741 ; C106D.2@76.344,19.219 75.944,18.819 IC2D.56@75.944,17.741 75.944,16.327 76.662,15.609 77.703,15.609 77.729,15.635 78.041,15.635 79.017,16.612 81.381,16.612 81.434,16.559 82.196,16.559
  L3 w0.127: v1(93.078,18.249) 93.078,17.51 93.813,16.775 93.813,15.478 93.223,14.887 93.223,13.499 93.973,12.749 93.973,9.249 94.705,8.517 v1(94.742,8.517)
  L4 w0.406: v1(69.977,19.286) 69.98,19.283 75.764,19.283 v1(76.327,19.845)
  other v1: 85.444,5.888 94.183,8.534 92.444,17.988
P3V3_MP: C10A.2 C10B.2 C48.2 D1A.4 D1B.4 IC8A.4 IC8B.4 IC12.8 IC26A.8 IC26B.8 J1A.30 J1B.30 R116.2 R120.1 R121.2 R122.2 R143.2 TP14.1 | length 397.7
  L1 w0.127: v1(149.669,90.855) 149.699,90.824 149.699,90.405 149.753,90.351 149.753,85.571 151.094,84.23 v1(151.094,79.613)
  L1 w0.298: TP14.1@139.994,14.981 141.923,14.981 R116.2@141.978,14.926
  L3 w0.127: v1(151.094,79.613) 154.042,76.666 154.042,69.218 154.205,69.055 154.205,59.193 154.042,59.03 154.042,58.563 153.495,58.017 153.495,56.338 ; v1(153.521,20.638) 153.521,56.338
  L4 w0.127: v1(101.997,79.812) 102.124,79.685 104.359,79.685 v1(105.172,78.872)
  L4 w0.152: v1(133.267,4.34) 133.328,4.401 J1B.30@133.328,14.726
  L6 w0.127: R143.2@7.689,2.739 8.035,3.085 8.035,6.694 6.698,8.031 6.698,11.078 5.884,11.892 5.884,21.113 5.573,21.424 5.573,22.419 6.199,23.045 6.199,27.709 5.905,28.004 5.905,38.226 5.573,38.557 5.573,39.419 5.884,39.73 5.884,55.247 5.573,55.557 5.573,56.419 5.884,56.73 5.884,72.247 5.573,72.557 5.573,73.419 5.884,73.73 5.884,86.94 6.882,87.938 7.279,87.938 9.897,90.556 99.258,90.556 100.981,88.833 100.981,87.475 101.482,86.974 101.482,86.445 102.124,85.802 102.124,82.984 102.075,82.935 v1@102.075,79.89 ; v1(105.172,78.872) 105.354,79.054 105.354,79.346 105.588,79.58 IC12.8@105.588,80.005 ; C48.2@106.061,81.648 106.112,81.597 106.112,81.107 105.588,80.584 IC12.8@105.588,80.005 ; R120.1@108.258,73.388 108.689,73.819 108.563,73.946 108.563,77.337 107.179,78.721 107.179,79.355 106.528,80.005 IC12.8@105.588,80.005 ; R122.2@108.589,76.281 109.871,76.281 112.227,78.638 112.227,82.519 117.984,88.276 124.195,88.276 127.107,91.188 149.336,91.188 v1(149.669,90.855) ; IC26B.8@133.235,11.683 133.328,11.776 J1B.30@133.328,14.726 ; J1B.30@133.328,14.752 134.649,14.752 136.528,12.872 139.043,12.872 139.807,12.108 IC8B.4@140.598,12.108 ; C10B.2@141.923,13.158 140.751,13.158 140.598,13.006 IC8B.4@140.598,12.108 ; v1(153.521,20.638) 153.521,16.668 152.098,15.246 J1A.30@152.098,14.727 152.098,13.487 147.949,9.338 145.414,9.338 144.444,10.308 IC8A.4@143.423,10.308 143.398,10.333 C10A.2@142.123,10.333 141.613,10.333 141.605,10.342 141.605,10.65 140.647,11.608 140.598,11.608 IC8B.4@140.598,12.108
  L6 w0.152: IC26A.8@133.111,3.359 133.111,3.859 133.201,3.949 133.201,4.274 v1(133.267,4.34) ; D1B.4@137.994,8.438 138.694,8.438 139.656,9.401 139.656,11.958 139.807,12.108 ; v1(141.101,14.935) 142.491,14.935 142.494,14.938 ; C10B.2@141.923,13.158 142.494,13.729 142.494,14.938 ; D1A.4@145.569,14.263 145.794,14.263 146.47,14.939 146.47,16.762 146.044,17.188 143.207,17.188 142.494,16.476 142.494,14.938
P3V3A: C78.2 IC7.1 IC7.18 IC7.19 IC7.20 L10.2 L14.2 L15A.2 L15B.2 L15C.2 L15D.2 L18A.2 L18B.2 L18C.2 L18D.2 R23.2 T1.2 TP13.1 | length 214.3
  L1 w0.152: v1(59.723,82.999) 60.955,82.999 L15A.2@61.044,83.088 60.428,83.705 60.394,83.671 60.394,83.638 59.969,83.638 v1(59.944,83.613) ; v1(59.969,16.188) 60.019,16.138 60.444,16.138 ; v1(59.973,15.499) 60.062,15.588 L15D.2@60.994,15.588 ; v1(60.169,37.638) 60.594,37.638 L15C.2@61.044,38.088 60.883,38.249 v1(60.223,38.249) ; v1(60.194,60.013) 60.219,60.038 60.444,60.038 60.428,60.022 60.428,59.972 L15B.2@61.044,60.588 60.901,60.731 60.223,60.731 v1(60.223,60.749) ; 60.403,16.18 60.444,16.138 ; L15D.2@61.044,15.588 L15D.2@60.994,15.588 ; v1(95.322,19.649) 95.322,18.82 L18D.2@95.592,18.55 ; v1(95.322,64.499) 95.322,63.82 L18B.2@95.592,63.55 ; L18C.2@95.592,41.05 95.592,41.75 95.542,41.8 95.521,41.8 95.67,41.949 v1(95.67,42.051) ; L18A.2@95.592,86.05 95.592,86.75 95.542,86.8 95.619,86.876 v1(95.619,87.136) ; v1(102.223,19.249) 102.223,18.961 v1(102.464,18.72) 105.973,15.211 105.973,7.311 105.983,7.301 106.495,7.301 106.775,7.021 107.171,7.021 107.451,7.301 107.451,7.438 C78.2@108.324,7.438 ; v1(106.223,34.249) 106.339,34.365 106.387,34.365 L14.2@107.137,35.115 107.003,35.249 v1(106.223,35.249) ; v1(106.973,15.499) 107.015,15.541 108.444,15.541 TP13.1@108.444,18.041 ; IC7.20@110.081,7.747 108.633,7.747 C78.2@108.494,7.608 ; IC7.18@110.081,9.047 109.99,9.138 R23.2@108.494,9.138 C78.2@108.494,7.608 ; IC7.1@111.131,6.697 109.146,6.697 108.405,7.438 C78.2@108.324,7.438 ; 60.444,16.138 L15D.2@60.994,15.588 ; C78.2@108.324,7.438 C78.2@108.494,7.608
  L1 w0.5: T1.2@51.86,17.375 54.639,20.154 v1(54.639,20.264) v1(54.639,21.178) ; v1@106.995,29.154 L10.2@108.093,29.154 108.055,29.192 108.055,29.91 107.744,30.221 v1(107.242,30.221)
  L3 w0.152: v1(59.723,82.999) 59.723,67.249 59.723,62.97 59.647,62.894 59.647,60.825 59.723,60.749 ; v1(59.973,15.499) 59.647,15.825 59.647,17.894 59.723,17.97 59.723,20.249 60.044,20.57 60.044,21.159 v1(60.133,21.159) ; v1@60.223,21.338 60.223,21.749 60.044,21.749 59.618,22.175 59.618,37.894 v1@59.973,38.249 ; v1(60.223,38.249) v1@59.973,38.249 ; v1(60.223,60.749) 59.723,60.749 ; v1(95.619,87.136) 95.619,87.005 95.287,86.674 95.287,84.254 95.355,84.186 95.355,83.79 95.288,83.723 95.36,83.651 95.36,83.255 95.287,83.182 95.287,79.021 95.322,78.986 95.322,69.803 95.647,69.478 95.647,68.353 95.322,68.028 v1(95.322,64.499) 95.322,62.211 95.8,61.733 95.8,61.337 95.734,61.272 95.734,60.727 95.322,60.315 95.548,60.089 95.548,42.172 v1(95.67,42.051) 95.67,39.392 ; 59.723,60.749 59.723,40.47 59.647,40.394 59.647,38.575 v1@59.973,38.249
  L4 w0.152: v1(60.133,21.159) 93.812,21.159 v1(95.322,19.649) ; v1(101.822,19.649) v1(102.223,19.249)
  L4 w0.5: v1(95.322,19.649) 95.322,19.875 96.422,20.975 100.496,20.975 v1(101.822,19.649)
  other v1: 110.694,4.738 111.444,4.738 109.944,5.488 110.694,5.488 111.444,5.488 106.723,14.999 106.244,15.698 106.223,16.249 101.791,18.759 94.723,19.749 102.473,19.749 61.044,20.138 60.473,20.499 60.681,21.006 60.604,21.615 60.071,21.742 60.579,22.225 60.096,22.403 106.994,29.153 96.444,41.988 94.73,42.076 96.194,64.488 94.723,64.499 96.444,86.988 94.831,87.136
P3V6: C63.1 C74.1 C75.2 C160.1 IC7.5 IC7.6 IC7.7 IC7.8 IC11.5 IC11.6 IC11.7 IC11.8 L2.2 R5.2 TP15.1 | length 115.5
  L1 w0.127: TP15.1@108.385,20.041 109.947,20.041 110.579,19.409 110.579,18.974 110.654,18.899 110.654,17.77 112.486,15.938 112.694,15.938 113.617,15.015 v1(113.617,14.282)
  L1 w0.152: R5.2@38.949,2.243 39.967,2.243 v1(39.973,2.249) ; C63.1@113.673,4.999 113.973,5.299 113.973,5.499 v1(113.723,5.749)
  L1 w0.35: 125.481,7.802 IC11.5@125.481,8.53 126.141,8.53 126.162,8.509 ; 126.503,9.202 126.531,9.202 IC11.6@126.531,9.58 127.427,9.58 127.457,9.55 ; IC11.7@126.531,10.23 127.362,10.23 127.381,10.211 ; IC11.8@126.531,10.88 127.524,10.88 127.559,10.846 ; L2.2@129.079,6.019 129.638,6.019 L2.2@129.859,6.24 ; C74.1@129.362,2.172 129.362,4.915 132.093,4.915 131.115,3.937 131.115,2.709 131.044,2.638 131.166,2.517 131.166,1.569 v1(131.735,1.569) C75.2@133.029,1.569 ; C74.1@130.225,1.731 C74.1@130.226,1.729
  L1 w0.406: 125.476,7.544 125.481,7.549 125.481,7.802
  L3 w0.127: v1(113.617,14.282) 113.617,12.335 115.137,10.816 115.137,8.795 v1(116.194,7.738)
  L4 w0.152: v1(39.973,2.249) 45.973,2.249 50.723,6.999 57.912,6.999 60.177,4.734 68.19,4.734 68.997,5.541 78.171,5.541 78.646,6.016 83.591,6.016 84.194,5.413 86.306,5.413 86.741,4.978 95.161,4.978 96.063,5.88 98.414,5.88 98.633,6.099 99.029,6.099 99.087,6.041 106.158,6.041 106.386,6.269 113.203,6.269 v1(113.723,5.749)
  L6 w0.152: v1(127.473,10.499) v1@127.516,10.542
  L6 w0.5: C160.1@126.267,11.178 126.946,10.499 v1(127.473,10.499)
  other v1: 131.925,3.067 131.06,3.178 131.06,3.841 115.944,6.988 119.444,7.238 120.194,7.238 118.944,7.738
P5V0A: C77.2 C79.1 C165.2 C168.2 C170.2 C173.2 IC7.10 IC7.11 IC11.10 IC11.11 IC18.10 IC18.11 IC20.5 L6A.2 L6B.2 L6C.2 L6D.2 L7A.1 L7B.1 L7C.1 L7D.1 R131.2 R139.2 TP16.1 | length 380.8
  L1 w0.127: L6D.2@16.569,20.813 17.294,20.813 v1(17.469,20.638) ; L6C.2@16.569,37.813 17.294,37.813 v1(17.419,37.688) ; L6B.2@16.569,54.813 17.394,54.813 v1(17.469,54.738) ; L6A.2@16.569,71.813 v1(17.419,71.813) ; v1(16.843,89.682) 18.348,91.186 19.625,91.186 ; v1(17.348,52.755) 17.373,52.729 24.919,52.729 24.951,52.698 28.441,52.698 ; v1(17.424,69.671) 17.475,69.722 24.927,69.722 24.951,69.698 28.093,69.698 ; v1(17.449,18.744) 17.526,18.668 v1(17.973,18.668) ; C173.2@30.824,10.638 30.824,11.738 R131.2@31.024,11.938 ; v1(30.973,13.749) 31.024,13.697 v1(31.024,12.999) R131.2@31.024,11.938 ; TP16.1@38.044,12.888 38.074,12.858 C79.1@38.074,10.388 ; R139.2@38.949,3.743 38.949,3.793 39.824,4.669 39.824,8.897 38.333,10.388 C79.1@38.074,10.388 ; C77.2@113.694,12.688 113.694,13.736 114.304,14.346 v1(116.03,14.346) ; C77.2@113.719,12.644 113.795,12.568 113.795,11.425 114.379,11.425 114.781,11.023 IC7.10@114.781,10.347 ; 126.314,12.573 126.314,13.104 126.188,13.23 IC11.11@125.481,13.23 125.505,13.254 125.505,13.965 125.759,13.965 125.784,13.99 C165.2@125.784,14.541 126.427,14.541 v1(126.444,14.523) ; R131.2@31.024,11.938 31.024,11.569 32.094,10.499 IC20.5@32.094,10.31 32.223,10.181 32.223,9.435 35.371,9.435 C170.2@35.574,9.638 36.324,10.388 C79.1@38.074,10.388
  L1 w0.152: 19.625,91.186 113.18,91.186 114.938,89.428 114.938,88.013 114.044,87.119 114.044,82.638 114.294,82.388 114.294,81.784 114.247,81.737 114.247,81.701 113.554,81.008 113.554,80.938 C168.2@113.044,80.938 ; IC18.10@110.594,80.288 111.344,80.288 111.644,80.588 111.644,80.938 ; IC18.11@111.644,81.338 111.644,80.938 ; v1(113.044,80.138) C168.2@113.044,80.938 ; 126.314,12.573 126.314,12.243 126.377,12.18 IC11.10@126.531,12.18 ; 111.644,80.938 C168.2@113.044,80.938
  L1 w0.254: v1(17.373,35.737) 17.451,35.659 30.44,35.659 30.569,35.788 30.544,35.813 L7C.1@30.544,36.813 ; v1@17.373,52.729 17.443,52.659 25.353,52.659 25.357,52.663 30.344,52.663 30.544,52.863 L7B.1@30.544,53.813 ; v1(17.424,69.671) 17.436,69.659 v1(17.944,69.659) 30.34,69.659 30.544,69.863 L7A.1@30.544,70.813 ; v1(17.973,18.668) 17.981,18.659 30.165,18.659 30.544,19.038 L7D.1@30.544,19.813
  L3 w0.127: v1(16.843,89.682) 16.793,89.631 16.793,81.63 17.419,81.004 v1(17.419,71.813) v1(17.419,37.688) 17.419,20.688 v1(17.469,20.638) 17.449,20.619 v1(17.449,18.744)
  L3 w0.152: v1(113.044,80.138) 113.044,72.872 112.952,72.78 112.454,72.282 112.454,64.306 112.952,63.808 112.952,55.833 114.193,54.591 114.193,47.22 113.05,46.076 113.05,45.275 113.226,45.1 113.226,44.643 113.359,44.509 113.359,37.009 113.808,36.561 113.808,31.382 113.291,30.865 113.291,30.49 113.449,30.333 113.449,26.778 113.943,26.284 113.943,17.179 116.03,15.092 v1(116.03,14.346)
  L4 w0.127: v1(116.03,14.346) 116.03,14.295 116.31,14.015 118.64,14.015 119.147,13.507 125.428,13.507 v1(126.444,14.523)
  other v1: 31.629,13.627 17.223,18.249 18.019,35.688 17.894,52.763
P7V0A: C12A.2 C12B.2 C12C.2 C12D.2 C27A.2 C27B.2 C27C.2 C27D.2 C155.2 C177.2 C215.2 IC21.9 IC21.10 R137A.1 R137B.1 R137C.1 R137D.1 R177.2 TP17.1 | length 32.7
  L1 w0.17: TP17.1@17.544,12.638 20.544,12.638 ; R137D.1@21.544,19.938 C27D.2@23.544,19.938 24.694,19.938 C12D.2@25.144,20.388 ; R137C.1@21.544,36.938 C27C.2@23.544,36.938 24.694,36.938 C12C.2@25.144,37.388 ; R137B.1@21.544,53.938 C27B.2@23.544,53.938 24.694,53.938 C12B.2@25.144,54.388 ; R137A.1@21.544,70.938 C27A.2@23.544,70.938 24.694,70.938 C12A.2@25.144,71.388 ; C177.2@24.817,11.58 24.817,12.441 ; v1(25.119,21.613) 25.119,20.413 C12D.2@25.144,20.388 ; v1(25.119,38.613) 25.119,37.413 C12C.2@25.144,37.388 ; v1(25.119,55.613) 25.119,54.413 C12B.2@25.144,54.388 ; v1(25.119,72.613) 25.119,71.413 C12A.2@25.144,71.388 ; v1(25.144,19.163) C12D.2@25.144,20.388 ; v1(25.144,36.163) C12C.2@25.144,37.388 ; v1(25.144,53.163) C12B.2@25.144,54.388 ; v1(25.144,70.163) C12A.2@25.144,71.388 ; 26.185,12.641 26.369,12.457 IC21.9@26.369,11.815
  L6 w0.152: v1(26.223,16.249) 26.223,15.19 R177.2@27.574,13.838
  other v1: 25.552,16.18 24.973,16.249 25.723,16.749 24.968,16.789
P7V5: C178.2 C179.2 C211.2 C217.2 IC22.6 L4.2 L5.1 R53.2 R134.2 R194.2 | length 24.2
  L1 w0.254: L5.1@114.144,1.638 L5.1@113.644,2.138 113.644,2.881 114.517,3.754 115.452,3.754 115.153,4.053 C211.2@115.704,4.053 ; L4.2@117.752,1.663 118.618,1.663 v1(119.294,2.339) 119.294,4.197 119.752,4.656 125.375,4.656 125.67,4.361 IC22.6@125.67,3.009
  L6 w0.254: R194.2@118.061,1.767 119.32,1.767 v1(119.329,1.758) 119.396,1.758 119.593,1.561 C217.2@119.878,1.561 ; C178.2@119.973,2.366 119.321,2.366 v1(119.294,2.339) 119.294,2.884 119.643,3.233 121.707,3.233 121.982,2.959 R53.2@121.982,2.947 ; R53.2@121.946,3.175 122.224,3.452 122.224,3.878 122.301,3.955 122.301,4.375 R134.2@122.581,4.656
  other v1: 119.152,0.965
P7V5A: C132.2 C156.1 C171.2 C183.2 IC20.1 IC21.1 IC21.2 IC21.3 L5.2 R193.1 | length 26.4
  L1 w0.152: 24.969,6.328 25.003,6.328 25.013,6.338 ; 28.642,7.988 29.02,7.61 IC20.1@32.094,7.61 32.094,6.218 C171.2@32.374,5.938 ; L5.2@110.444,2.138 111.223,1.36 111.223,-0.275 111.944,-0.997 C183.2@111.944,-1.112
  L1 w0.203: IC21.3@26.869,8.815 26.895,8.789 26.895,8.267 27.173,7.988 28.642,7.988 29.149,8.496 29.149,9.407 28.751,9.805 ; 32.688,5.04 33.026,4.702 34.798,4.702 35.343,5.247 R193.1@35.343,6.011
  L1 w0.5: v1(103.473,0.499) 103.473,0.797 104.814,2.138 L5.2@110.444,2.138
  L3 w0.152: v1(102.723,0.249) 103.223,0.249 v1(103.473,0.499)
  other v1: 28.723,4.499 29.473,4.499 28.223,4.999 28.973,4.999 29.723,4.999
P12V0: C64.2 C70.2 C181.2 C182.2 C218.2 IC15.A2 IC15.B3 IC15.D3 IC15.E2 IC22.1 IC22.8 IC27.2 IC27.3 J1A.28 J1A.29 J1B.28 J1B.29 R33.2 R166.2 R196.2 TP18.1 | length 35.6
  L1 w0.254: v5@124.05,-1.078 124.56,-1.078 124.56,-1.113 C182.2@124.773,-1.326 ; R33.2@125.178,17.47 TP18.1@126.644,17.47 ; IC22.8@125.194,0.341 124.773,0.341 ; TP18.1@126.568,17.707 126.822,17.453 v1(127.664,17.453) ; C181.2@127.944,1.541 127.761,1.541 127.76,1.54 127.76,1.312 127.633,1.185 127.528,1.291 IC22.1@125.944,1.291 124.731,1.291 124.71,1.27 124.71,0.366 124.736,0.341 124.773,0.341 ; C182.2@124.773,-1.326 124.773,-1.377 C182.2@124.958,-1.562 124.958,-1.511 C182.2@124.773,-1.326 ; C182.2@124.773,-1.326 124.773,0.341
  L3 w0.254: v1(127.664,17.453) 127.943,17.174 127.943,14.719 130.821,14.719 J1B.28@133.361,17.259
  L4 w0.254: v1(111.973,-2.767) 112.039,-2.767 112.234,-2.962 113.647,-2.962 114.435,-2.174 119.528,-2.174 119.652,-2.05
  L6 w0.254: v1(111.973,-2.767) 111.973,-2.1 112.246,-1.827 R196.2@112.756,-1.827 ; IC27.3@121.747,-0.691 122.597,-0.691 122.822,-0.916 123.135,-0.916 C218.2@123.291,-1.072 123.291,-0.617 122.875,-0.201 IC27.2@121.827,-0.201 ; C218.2@123.303,-1.084 123.312,-1.075 124.047,-1.075 124.05,-1.078 124.666,-1.078 124.674,-1.086 124.821,-1.086 125.144,-1.409 R166.2@125.144,-1.459
  other v1: 142.194,0.541 142.944,0.541 127.507,1.059
  other v5: 124.025,-1.078 143.694,8.041 143.944,9.041
PGOOD: IC7.9 IC11.9 IC15.B4 IC15.D4 IC18.9 IC22.7 LD7.2 R53.1 R198.1 | length 271.8
  L1 w0.152: IC18.9@109.944,80.288 109.944,79.157 v1(109.96,79.141) ; v1(112.473,17.249) 113.723,15.999 v1(114.473,15.999) ; IC7.9@114.781,9.697 115.279,9.697 115.581,9.999 ; v1(124.979,3.97) 125.021,3.97 125.035,3.956 125.035,3.715 125.194,3.556 IC22.7@125.194,3.241 ; IC11.9@126.531,11.53 126.881,11.53 127.117,11.766 127.284,11.933 127.284,12.347 v1@127.048,12.583 ; IC15.D4@144.952,2.675 145.093,2.675 v1(145.571,3.153) ; IC15.B4@144.952,5.215 145.571,5.834 v1(145.571,5.903)
  L3 w0.152: v1(56.723,8.499) 56.27,8.952 56.27,25.046 v1(56.723,25.499) ; v1(109.96,79.141) 109.96,77.593 109.558,77.19 109.558,60.458 111.53,58.485 111.53,51.575 110.146,50.191 110.146,49.381 110.132,49.367 110.132,47.631 112.51,45.253 112.51,45.062 112.68,44.892 112.68,44.435 112.784,44.331 112.784,43.46 112.784,42.96 112.784,42.46 112.784,42.163 110.773,40.152 110.544,40.152 ; v1@110.194,26.487 110.819,27.112 110.819,28.22 110.392,28.647 110.392,35.424 110.266,35.55 110.266,35.925 110.266,39.284 110.266,39.659 110.269,39.662 110.269,39.857 110.527,40.116 110.527,40.152 ; v1(110.227,26.345) 110.227,26.334 110.546,26.015 110.557,26.015 110.557,21.636 110.709,21.484 110.709,19.549 111.201,19.058 111.201,18.382 112.333,17.249 v1(112.473,17.249) ; v1(114.473,15.999) 115.722,14.749 115.722,14.678 115.577,14.533 115.577,10.394 v1(115.722,10.249) ; v1(126.935,12.757) 126.935,7.131 127.206,6.859 127.456,6.859 128.444,5.872 ; v1(128.444,4.791) 128.444,5.872 ; v1(145.571,5.903) 145.571,5.809 145.823,5.557 145.823,4.26 145.571,4.007 v1(145.571,3.153) 144.926,2.508 144.926,2.118 144.347,1.539 143.972,1.539 142.802,2.709 142.802,4.64 140.728,6.714 129.286,6.714 128.444,5.872
  L4 w0.127: v1(56.723,25.499) 57.767,26.543 68.377,26.543 68.631,26.797 68.947,26.797 69.328,27.178 70.282,27.178 70.776,26.684 70.776,26.379 71.754,25.401 74.338,25.401 74.388,25.451 75.65,25.451 76.149,25.951 76.149,26.086 77.225,27.161 79.341,27.161 79.578,26.924 84.226,26.924 85.256,25.894 86.292,25.894 86.55,26.152 86.55,26.377 87.307,27.135 94.686,27.135 95.752,26.068 98.005,26.068 98.376,26.439 108.01,26.439 108.296,26.153 109.356,26.153 109.547,26.345 v1(110.227,26.345)
  L4 w0.152: LD7.2@1.534,5.488 1.534,6.741 2.993,8.2 3.718,8.2 3.857,8.338 6.373,8.338 8.173,10.138 11.149,10.138 12.149,11.138 19.044,11.138 22.884,7.298 27.173,7.298 27.723,6.749 42.723,6.749 44.473,8.499 v1(56.723,8.499) ; v1(115.723,13.749) 118.529,13.749 119.048,13.23 126.462,13.23 v1(126.935,12.757) ; v1(124.634,6.041) 124.634,4.315 v1(124.979,3.97) 126.531,3.97 126.697,4.137 127.79,4.137 v1(128.444,4.791)
  L6 w0.152: R53.1@123.63,3.163 123.63,3.213 124.004,3.587 124.054,3.587 124.414,3.946 124.955,3.946 v1(124.979,3.97) ; R198.1@123.943,6.058 124.617,6.058 v1(124.634,6.041)
Profile_P1: IC10.N13
R\E\_DE0: IC1A.1 IC1A.40 IC10.P15 | length 31.4
  L1 w0.127: IC10.P15@135.97,66.841 136.554,66.256 138.424,66.256 v1(139.729,64.952)
  L3 w0.127: v1(139.729,64.952) 139.729,63.267 140.91,62.086 140.91,56.188 140.337,55.616 140.337,51.906 140.772,51.472 140.772,47.796 141.031,47.536 v1(141.031,47.435)
  L4 w0.127: v1(141.031,47.435) 145.843,47.435 v1(146.053,47.645)
  L6 w0.127: IC1A.40@141.031,46.346 v1(141.031,47.435) ; IC1A.1@145.731,45.646 145.731,46.528 146.053,46.85 v1(146.053,47.645)
R\E\_DE1: IC1A.5 IC1A.42 IC10.M15 | length 38.1
  L1 w0.127: IC10.M15@135.97,68.841 136.554,68.256 140.862,68.256 v1(140.883,68.236)
  L3 w0.127: v1(140.883,68.236) 140.883,66.662 141.966,65.58 141.966,57.547 142.031,57.482 v1(142.031,49.327) ; v1(144.821,43.548) 145.4,44.127 145.4,46.67 144.936,47.135 v1(144.936,49.677)
  L4 w0.127: v1(142.031,49.327) 142.381,49.677 v1(144.936,49.677)
  L6 w0.127: IC1A.42@142.031,46.346 142.031,47.171 v1(142.031,49.327) ; v1(144.821,43.548) 144.919,43.646 IC1A.5@145.731,43.646